# Altium PCB Copy of TQ210_BOARD_V4-20121031.PcbDoc (part 7 of 8)
Units mm, origin at the board's own origin, x right, y up, seen from the top; angles counter-clockwise.
Board outline 191.2 x 131.27 mm, 2 copper layers (TopLayer, BottomLayer); 362 components, 455 nets, 1594 pads, 630 vias.
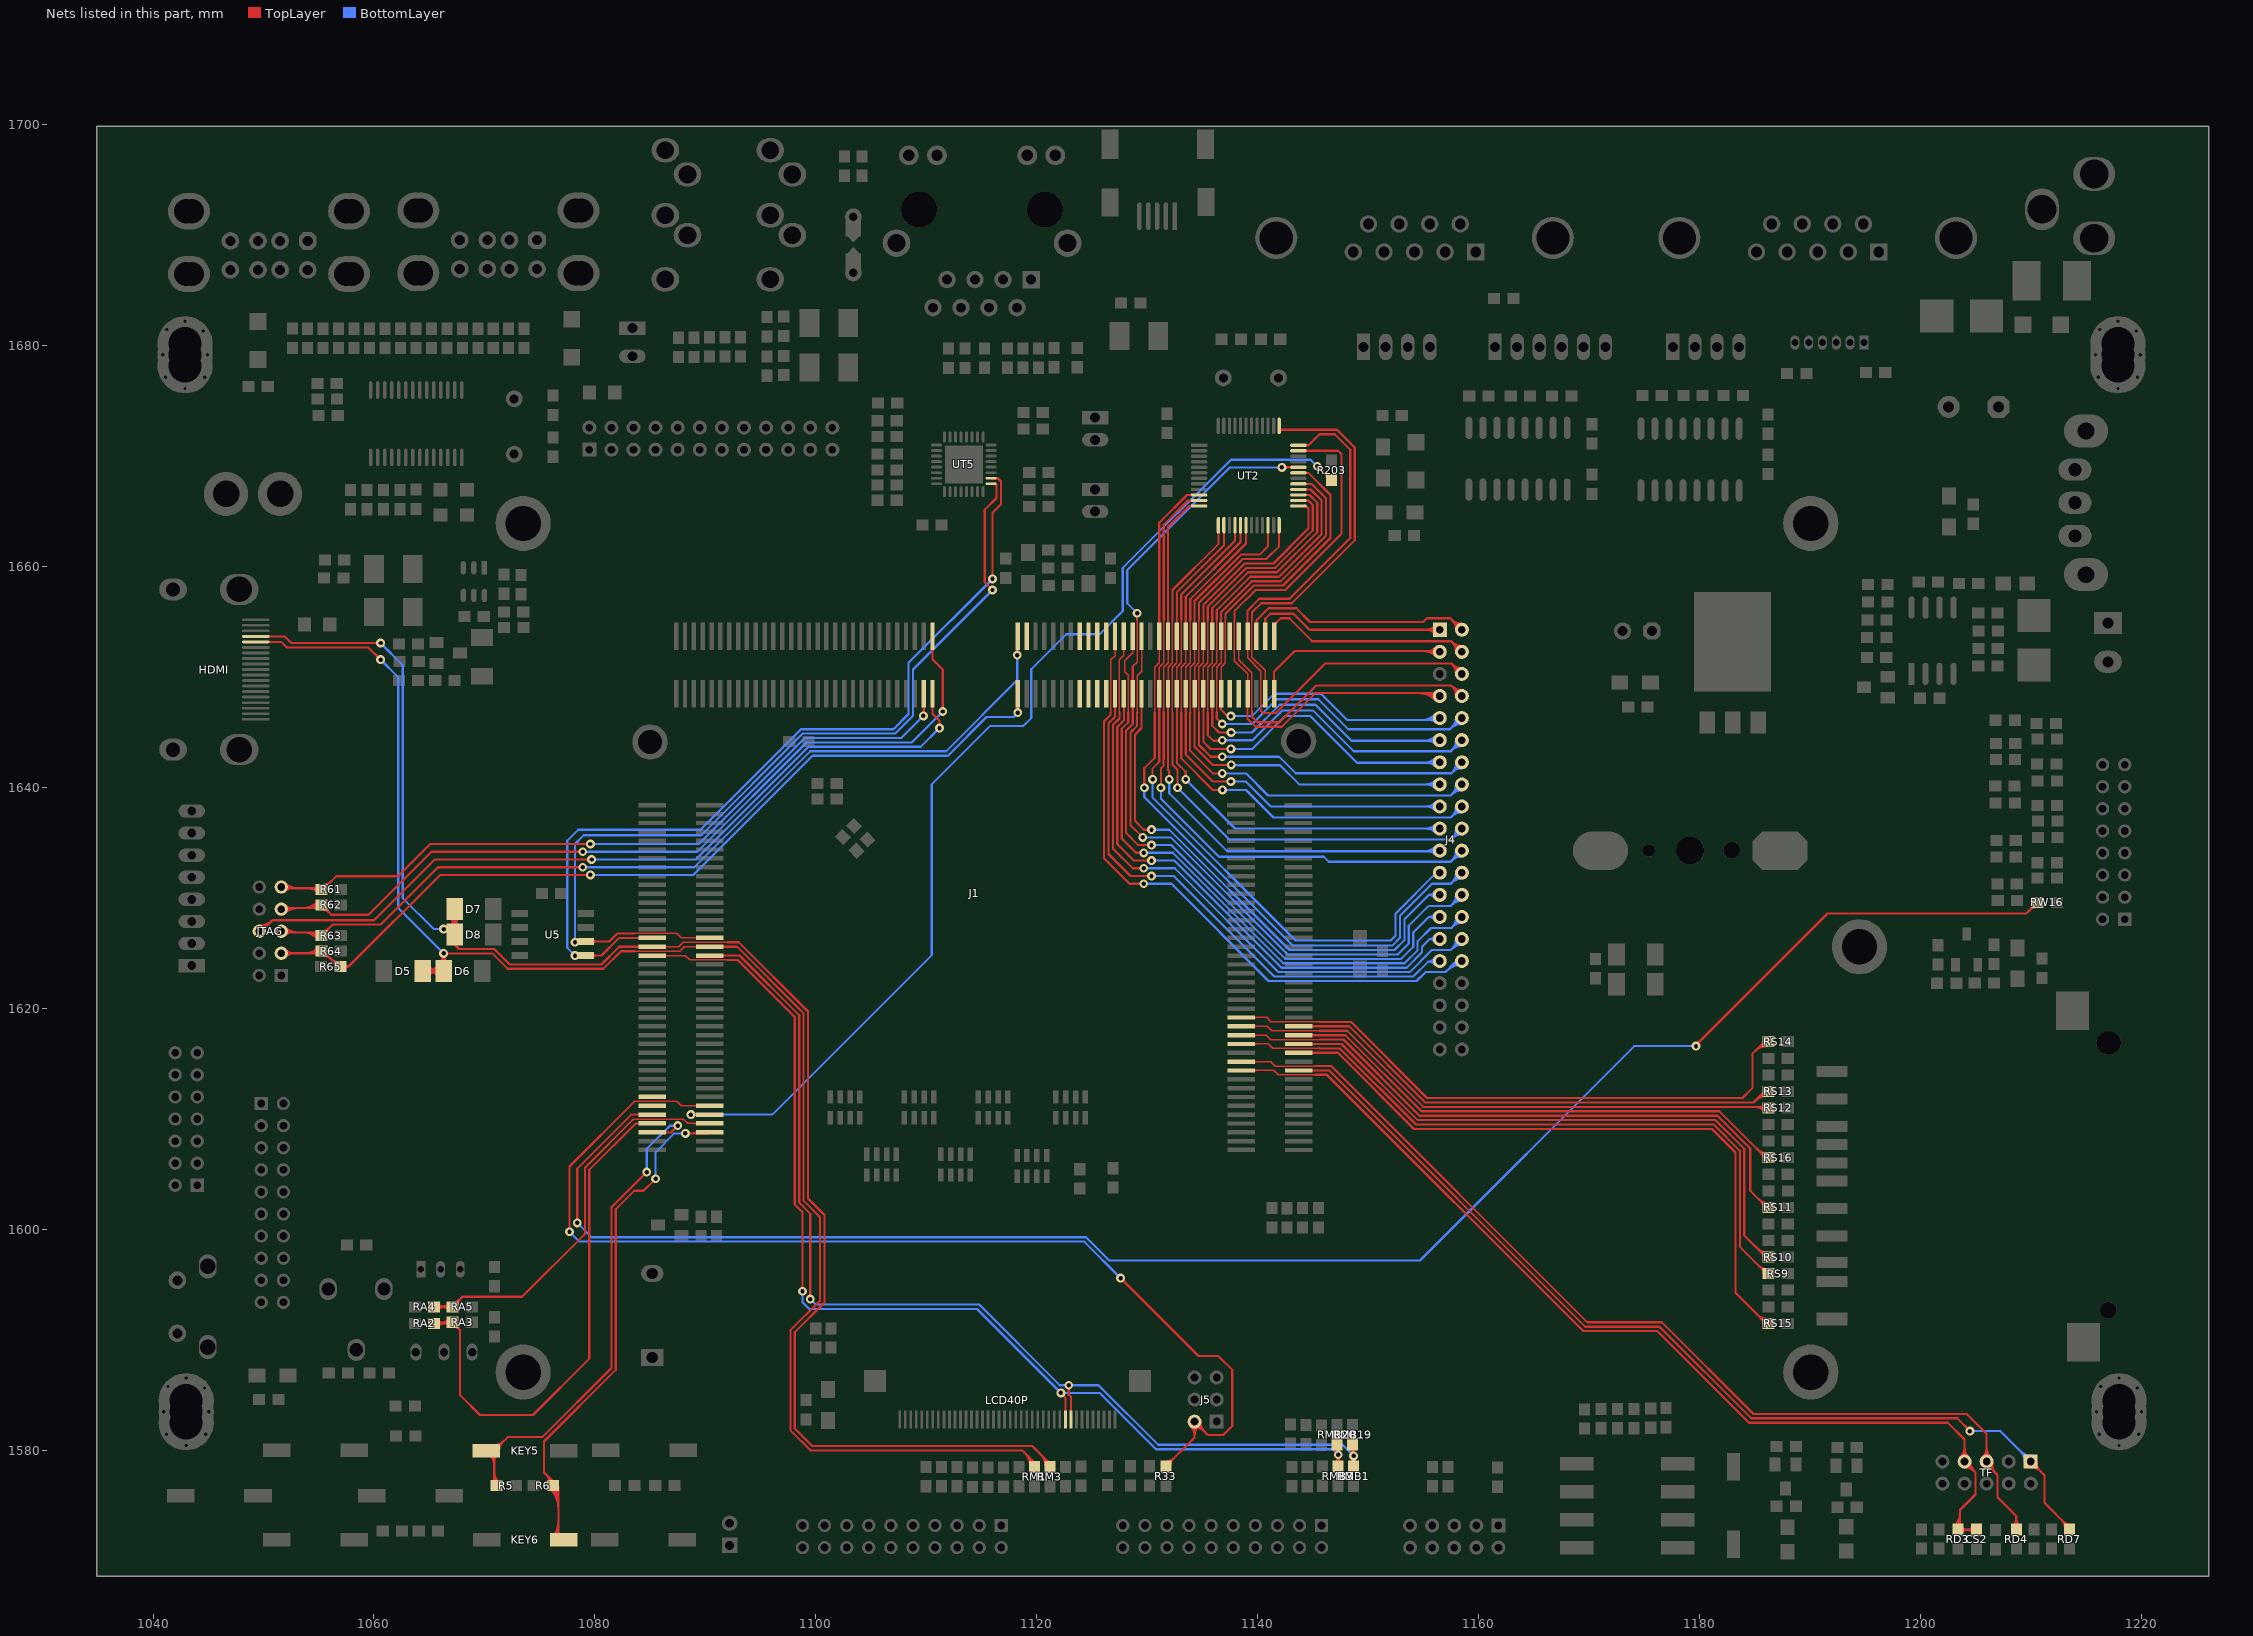
[diagram p7: the nets of this part, all layers, seen from the top]

## Via types
v1: diameter 1, hole 0.5, TopLayer to BottomLayer, 458 vias
v2: diameter 0.8, hole 0.4, TopLayer to BottomLayer, 172 vias

## Nets (pads, with @x,y where several pads share a name; then routed paths per layer and width w, separated by ;. In a path a pad name is that pad's centre, name@x,y a point inside that pad or via, vN(x,y) a via of type N, cw(c..) or ccw(c..) an arc to the next point about the centre after c; other vN are vias at no path point) (continued)
XEINT4: J1.5 KEY5.1 R5.1 | length 52.6
  TopLayer w0.2: KEY5.1@1070.472,1579.622 cw(c1069.44,1578.59) 1070.9,1578.59 ; KEY5.1@1070.614,1579.764 cw(c1069.923,1579.073) 1070.9,1579.073 ; R5.1@1070.767,1577.083 ccw(c1070.446,1577.404) 1070.9,1577.404 ; KEY5.1@1070.826,1580.276 ccw(c1070.826,1581.121) KEY5.1@1071.423,1580.523 ; KEY5.1@1070.826,1580.476 ccw(c1070.826,1581.804) 1071.765,1580.865 ; R5.1@1070.9,1576.8 1070.9,1580 1072.1,1581.2 1075.234,1581.2 1081.5,1587.466 1081.5,1602 v2(1084.7,1605.2) ; 1070.9,1577.645 ccw(c1071.895,1577.645) R5.1@1071.191,1576.941 ; 1070.9,1578.128 ccw(c1072.378,1578.128) R5.1@1071.333,1577.083 ; 1070.9,1578.948 cw(c1071.854,1578.948) KEY5.1@1071.18,1579.622 ; KEY5.1@1071.126,1579.976 cw(c1071.73,1579.976) KEY5.1@1071.303,1580.403 ; KEY5.1@1071.326,1579.976 cw(c1072.412,1579.976) 1071.644,1580.744 ; J1.5@1085.21,1608.79 1086.89,1608.79 v2(1087.5,1609.4) ; J1.5@1086.321,1608.729 cw(c1086.466,1608.584) 1086.466,1608.79 ; J1.5@1086.321,1608.871 ccw(c1086.517,1609.067) 1086.517,1608.79
  BottomLayer w0.2: v2(1084.7,1605.2) 1084.7,1607.3 1086.8,1609.4 v2(1087.5,1609.4)
XEINT5: J1.6 KEY6.1 R6.1 | length 57.5
  TopLayer w0.2: 1075.509,1577.891 cw(c1074.445,1576.826) R6.1@1075.95,1576.803 ; 1075.843,1577.557 cw(c1075.103,1576.816) R6.1@1076.15,1576.8 ; R6.1@1075.967,1576.517 cw(c1074.198,1574.748) 1076.7,1574.748 ; R6.1@1076.109,1576.659 cw(c1074.681,1575.231) 1076.7,1575.231 ; KEY6.1@1076.196,1572.254 ccw(c1074.981,1573.469) 1076.7,1573.469 ; R6.1@1076.25,1576.8 cw(c1075.164,1575.714) 1076.7,1575.714 ; KEY6.1@1076.338,1572.112 ccw(c1075.464,1572.986) 1076.7,1572.986 ; R6.1@1076.391,1576.941 cw(c1075.646,1576.196) 1076.7,1576.196 ; KEY6.1@1076.479,1571.971 ccw(c1075.946,1572.504) 1076.7,1572.504 ; KEY6.1@1076.7,1571.9 1076.7,1576.7 1075.4,1578 1075.4,1580.8 1081.9,1587.3 1081.9,1601.834 1083.566,1603.5 1084.4,1603.5 v2(1085.5,1604.6) ; 1076.7,1572.745 ccw(c1077.395,1572.745) KEY6.1@1076.904,1572.254 ; v2(1088.2,1608.7) 1090.321,1608.7 J1.6@1090.41,1608.79 ; 1088.867,1608.7 ccw(c1088.867,1609.283) J1.6@1089.279,1608.871
  BottomLayer w0.2: v2(1085.5,1604.6) 1085.5,1607 1087.2,1608.7 v2(1088.2,1608.7)
XEINT6: J1.7 RA2.2 RA3.1 | length 52.6
  TopLayer w0.2: RA2.2@1065.45,1591.5 1067.2,1591.5 1067.8,1590.9 1067.8,1585 1069.6,1583.2 1074.406,1583.2 1079.5,1588.294 1079.5,1591.2 1079.5,1605.4 1083.69,1609.59 J1.7@1085.21,1609.59 ; RA2.2@1065.783,1591.217 cw(c1066.466,1590.534) 1066.466,1591.5 cw(c1066.466,1592.466) RA2.2@1065.783,1591.783 ; RA2.2@1065.843,1591.5 ccw(c1065.843,1592.807) RA3.1@1066.767,1591.883 ; RA3.1@1066.767,1591.317 ccw(c1066.326,1590.876) 1066.326,1591.5 ccw(c1066.326,1592.324) RA3.1@1066.909,1591.741 ; RA3.1@1067.15,1591.2 cw(c1067.15,1590.355) 1067.747,1590.953 ; RA3.1@1067.548,1591.56 ccw(c1068.332,1591.482) 1067.775,1590.925
XEINT7: J1.257 RS15.2 | length 62.3
  TopLayer w0.2: J1.257@1143.715,1615.995 1147.276,1615.995 1154.171,1609.1 1181.137,1609.1 1183.269,1606.969 1183.269,1594.259 1186.028,1591.5 RS15.2@1186.25,1591.5 ; 1185.223,1592.305 ccw(c1186.2,1593.282) RS15.2@1186.2,1591.9 ; 1185.564,1591.963 ccw(c1186.2,1592.599) RS15.2@1186.2,1591.7 ; 1185.639,1591.889 cw(c1185.25,1591.5) RS15.2@1185.8,1591.5
XEINT8: J1.8 RA4.2 RA5.1 | length 41
  TopLayer w0.135: 1083.5,1610 1088,1610 1088.4,1609.6 J1.8@1090.4,1609.6 ; J1.8@1089.256,1609.506 ccw(c1089.03,1609.28) 1089.03,1609.6 ccw(c1089.03,1609.92) J1.8@1089.256,1609.694
  TopLayer w0.2: RA4.2@1065.45,1593 RA5.1@1067.1,1593 1068,1593.9 1073.4,1593.9 1079.032,1599.532 ; RA4.2@1065.783,1592.717 cw(c1066.466,1592.034) 1066.466,1593 cw(c1066.466,1593.966) RA4.2@1065.783,1593.283 ; RA5.1@1066.767,1592.717 ccw(c1066.084,1592.034) 1066.084,1593 ccw(c1066.084,1593.966) RA5.1@1066.767,1593.283 ; RA5.1@1067.15,1593.4 ccw(c1067.15,1594.245) 1067.747,1593.647 ; RA5.1@1067.35,1593 cw(c1067.954,1593) RA5.1@1067.527,1593.427 ; RA5.1@1067.55,1593 cw(c1068.636,1593) 1067.868,1593.768 ; 1079.1,1599.6 1079.1,1605.6 1083.426,1609.926
XEINT9: J1.9 RW16.1 | length 162.8
  TopLayer w0.2: v2(1078.4,1600.6) 1078.4,1605.5 1083.3,1610.4 J1.9@1085.2,1610.4 J1.9@1085.21,1610.39 ; v2(1179.7,1616.6) 1179.7,1616.7 1191.6,1628.6 1209.6,1628.6 1210.605,1629.605 RW16.1@1210.621,1629.605 ; 1209.865,1628.865 ccw(c1209.125,1629.605) RW16.1@1210.171,1629.605 ; 1209.946,1628.946 cw(c1210.571,1628.32) RW16.1@1210.571,1629.205 ; RW16.1@1210.206,1629.206 ccw(c1209.808,1629.605) RW16.1@1210.371,1629.605
  BottomLayer w0.2: v2(1078.4,1600.6) 1079.7,1599.3 1124.466,1599.3 1126.566,1597.2 1154.7,1597.2 1174.1,1616.6 v2(1179.7,1616.6)
XEINT10: J1.10 R203.2 | length 101.6
  TopLayer w0.2: v2(1088.7,1610.4) J1.10@1090.4,1610.4 J1.10@1090.41,1610.39 ; J1.10@1089.279,1610.329 ccw(c1089.109,1610.159) 1089.109,1610.4 ccw(c1089.109,1610.641) J1.10@1089.279,1610.471 ; v2(1145.4,1669.1) 1145.45,1669.1 R203.2@1146.7,1667.85 R203.2@1146.5,1667.85 ; 1145.932,1668.618 ccw(c1146.7,1669.386) R203.2@1146.7,1668.3 ; 1146.053,1668.497 cw(c1145.455,1667.9) R203.2@1146.3,1667.9 ; R203.2@1146.273,1668.277 ccw(c1146.7,1668.704) R203.2@1146.7,1668.1
  BottomLayer w0.2: v2(1088.7,1610.4) 1096.059,1610.4 1110.5,1624.84 1110.5,1640.299 1115.798,1645.597 1118.805,1645.597 1119.505,1646.297 1119.505,1650.734 1122.671,1653.9 1125.7,1653.9 1127.8,1656 1127.8,1659.9 1137.6,1669.7 1144.8,1669.7 v2(1145.4,1669.1)
XEINT11: J1.11
XEINT14: J1.12 J5.2 R33.2 | length 113.2
  TopLayer w0.135: 1083.6,1611.6 1087.4,1611.6 1087.8,1611.2 J1.12@1090.4,1611.2 ; J1.12@1089.256,1611.106 ccw(c1089.03,1610.88) 1089.03,1611.2 ccw(c1089.03,1611.52) J1.12@1089.256,1611.294
  TopLayer w0.2: v2(1077.7,1599.8) 1077.7,1605.7 1083.6,1611.6 ; v2(1127.6,1595.6) 1134.652,1588.548 1136.452,1588.548 1137.7,1587.3 1137.7,1582.2 1136.9,1581.4 1135.5,1581.4 J5.2@1134.3,1582.6 1134.3,1581.15 R33.2@1131.7,1578.55 ; R33.2@1131.7,1578.8 ccw(c1131.7,1579.404) R33.2@1132.127,1578.977 ; R33.2@1131.7,1579 ccw(c1131.7,1580.086) 1132.468,1579.318 ; R33.2@1132.1,1578.6 cw(c1132.945,1578.6) 1132.347,1579.197 ; J5.2@1133.922,1582.222 cw(c1133.008,1581.308) 1134.3,1581.308 cw(c1135.592,1581.308) J5.2@1134.678,1582.222 ; J5.2@1134.063,1582.363 cw(c1133.491,1581.791) 1134.3,1581.791 cw(c1135.109,1581.791) J5.2@1134.537,1582.363 ; 1134.872,1582.028 cw(c1135.444,1582.6) 1134.635,1582.6 ccw(c1135.444,1582.6) 1134.872,1582.028 ; 1134.872,1582.028 ccw(c1134.3,1581.456) 1134.3,1582.265 cw(c1134.3,1581.456) 1134.872,1582.028 ; 1135.213,1581.687 cw(c1136.127,1582.6) 1134.835,1582.6 ccw(c1136.127,1582.6) 1135.213,1581.687 ; 1135.213,1581.687 ccw(c1134.3,1580.773) 1134.3,1582.065 cw(c1134.3,1580.773) 1135.213,1581.687
  BottomLayer w0.2: v2(1077.7,1599.8) 1078.6,1598.9 1124.3,1598.9 v2(1127.6,1595.6)
XEINT15: J1.13
XI2CSCL0: J1.50 U5.6 UT5.17 | length 82.7
  TopLayer w0.135: 1083.6,1626.8 1087.4,1626.8 1087.8,1626.4 J1.50@1090.4,1626.4
  TopLayer w0.2: U5.6@1079.194,1626.072 1081.306,1626.072 1082.034,1626.8 1083.6,1626.8 ; U5.6@1079.78,1625.918 cw(c1080.151,1625.547) 1080.151,1626.072 cw(c1080.151,1626.597) U5.6@1079.78,1626.226 ; UT5.17@1115.878,1667.524 1116.176,1667.524 1116.368,1667.332 1116.368,1666.234 1115.3,1665.166 1115.3,1658.6 v2(1116,1657.9) ; UT5.17@1116.235,1667.506 cw(c1115.914,1667.185) 1116.368,1667.185 ; UT5.17@1116.242,1667.502 cw(c1116.144,1667.3) 1116.368,1667.3 ; UT5.17@1116.278,1667.521 ccw(c1116.459,1667.499) 1116.33,1667.37
  BottomLayer w0.2: v2(1078.2,1626) 1078.2,1634.9 1079,1635.7 1089.634,1635.7 1098.834,1644.9 1107.2,1644.9 1108.8,1646.5 1108.8,1650.7 v2(1116,1657.9)
XI2CSCL1: D5.1 D6.2 HDMI.15 J1.48 RM1.2 | length 158.7
  TopLayer w0.12: 1083.6,1625.2 1087.2,1625.2 1087.7,1625.2 1088.09,1625.59 J1.48@1090.41,1625.59
  TopLayer w0.2: HDMI.15@1049.3,1653.2 1051.6,1653.2 1052.1,1652.7 1059.495,1652.7 v2(1060.598,1651.597) ; D5.1@1064.4,1623.4 D6.2@1066.3,1623.4 v2(1066.3,1625) ; D5.1@1064.718,1623.082 cw(c1065.486,1622.314) 1065.486,1623.4 cw(c1065.486,1624.486) D5.1@1064.718,1623.718 ; D5.1@1064.86,1622.94 cw(c1065.969,1621.831) 1065.969,1623.4 cw(c1065.969,1624.969) D5.1@1064.86,1623.86 ; D6.2@1065.84,1622.94 ccw(c1064.731,1621.831) 1064.731,1623.4 ccw(c1064.731,1624.969) D6.2@1065.84,1623.86 ; D6.2@1065.895,1624.158 ccw(c1065.223,1625) v2(1066.3,1625) ; D6.2@1065.982,1623.082 ccw(c1065.214,1622.314) 1065.214,1623.4 ccw(c1065.214,1624.486) D6.2@1065.982,1623.718 ; D6.2@1066.019,1624.002 ccw(c1065.555,1624.585) 1066.3,1624.585 ccw(c1067.045,1624.585) D6.2@1066.581,1624.002 ; D6.2@1066.705,1624.158 cw(c1067.377,1625) v2(1066.3,1625) ; 1083.6,1625.2 1082.367,1625.2 1080.767,1623.6 1072.1,1623.6 1070.7,1625 v2(1066.3,1625) ; J1.48@1090.41,1625.59 1092.879,1625.59 1098.4,1620.068 1098.9,1619.569 1098.9,1602.6 1100.39,1601.11 1100.39,1593.556 1097.7,1590.866 1097.7,1581.82 1099.52,1580 1118.7,1580 RM1.2@1120,1578.7 ; 1118.868,1579.832 cw(c1117.585,1578.548) RM1.2@1119.4,1578.548 ; 1119.21,1579.49 cw(c1118.268,1578.548) RM1.2@1119.6,1578.548 ; 1119.551,1579.149 cw(c1118.951,1578.548) RM1.2@1119.8,1578.548
  BottomLayer w0.2: v2(1060.598,1651.597) 1062.2,1649.995 1062.2,1629.1 v2(1066.3,1625)
XI2CSCL2: J1.46 LCD40P.32 RMB1.2 RMB19.2 | length 100.1
  TopLayer w0.2: J1.46@1090.41,1624.79 1090.421,1624.8 1093.103,1624.8 1098.5,1619.403 1098.5,1602.434 1099.5,1601.434 v2(1099.5,1593.7) ; v2(1122.9,1585.9) 1122.9,1585.066 1123.1,1584.866 LCD40P.32@1123.1,1582.8 ; RMB19.2@1148.317,1580.217 cw(c1147.393,1579.293) v2@1148.7,1579.293 ; RMB1.2@1148.417,1578.883 ccw(c1147.734,1579.566) 1148.7,1579.566 ccw(c1149.666,1579.566) RMB1.2@1148.983,1578.883 ; RMB19.2@1148.459,1580.359 cw(c1147.876,1579.776) 1148.7,1579.776 cw(c1149.324,1579.776) RMB19.2@1148.883,1580.217 ; RMB1.2@1148.7,1578.55 RMB19.2@1148.7,1580.25
  BottomLayer w0.2: v2(1099.5,1593.7) 1100,1593.2 1114.8,1593.2 1122.1,1585.9 1125.6,1585.9 1131,1580.5 1147.7,1580.5 v2(1148.7,1579.5)
XI2CSDA0: J1.49 U5.5 UT5.18 | length 80.2
  TopLayer w0.2: U5.5@1079.194,1624.802 1080.602,1624.802 1082.2,1626.4 J1.49@1085.2,1626.4 ; U5.5@1079.78,1624.648 cw(c1080.151,1624.277) 1080.151,1624.802 cw(c1080.151,1625.327) U5.5@1079.78,1624.956 ; UT5.18@1115.878,1668.024 1116.471,1668.024 1116.768,1667.726 1116.768,1665.668 1116,1664.9 v2(1116,1658.9) ; UT5.18@1116.253,1667.999 cw(c1116.253,1667.413) 1116.667,1667.827 ; UT5.18@1116.259,1668 cw(c1116.347,1667.682) 1116.579,1667.915
  BottomLayer w0.2: v2(1078.2,1624.8) 1077.5,1625.5 1077.5,1635.2 1078.5,1636.2 1089.569,1636.2 1098.669,1645.3 1107.034,1645.3 1108.4,1646.666 1108.4,1651.3 v2(1116,1658.9)
XI2CSDA1: D7.1 D8.2 HDMI.16 J1.47 RM3.2 | length 154.9
  TopLayer w0.135: J1.47@1085.2,1625.6 1087.6,1625.6 1088,1626 1092,1626
  TopLayer w0.2: HDMI.16@1049.3,1653.7 1051.9,1653.7 1052.503,1653.097 v2(1060.598,1653.097) ; D8.2@1066.84,1627.41 ccw(c1065.731,1628.519) 1067.3,1628.519 ccw(c1068.869,1628.519) D8.2@1067.76,1627.41 ; D7.1@1066.84,1628.29 cw(c1065.731,1627.181) 1067.3,1627.181 cw(c1068.869,1627.181) D7.1@1067.76,1628.29 ; D8.2@1066.982,1627.268 ccw(c1066.214,1628.036) 1067.3,1628.036 ccw(c1068.386,1628.036) D8.2@1067.618,1627.268 ; D7.1@1066.982,1628.432 cw(c1066.214,1627.664) 1067.3,1627.664 cw(c1068.386,1627.664) D7.1@1067.618,1628.432 ; D7.1@1067.3,1629.4 1067.3,1625.8 1067.7,1625.4 1070.9,1625.4 1072.3,1624 1080.601,1624 1082.201,1625.6 J1.47@1085.2,1625.6 J1.47@1085.21,1625.59 ; 1092,1626 1093.034,1626 1099.3,1619.734 1099.3,1602.8 1100.79,1601.31 1100.79,1593.39 1098.1,1590.7 1098.1,1581.985 1099.685,1580.4 1119.6,1580.4 RM3.2@1121.3,1578.7 ; 1120.339,1579.661 cw(c1119.226,1578.548) RM3.2@1120.8,1578.548 ; 1120.681,1579.319 cw(c1119.909,1578.548) RM3.2@1121,1578.548 ; 1120.947,1579.053 ccw(c1121.2,1579.306) RM3.2@1121.2,1578.948
  BottomLayer w0.2: v2(1060.598,1653.097) 1062.6,1651.095 1062.6,1630 1065.4,1627.2 v2(1066.3,1627.2)
XI2CSDA2: J1.45 LCD40P.31 RMB3.2 RMB20.2 | length 103.5
  TopLayer w0.135: J1.45@1085.2,1624.8 1088.2,1624.8 1088.6,1624.4 1092,1624.4
  TopLayer w0.2: 1092,1624.4 1092.937,1624.4 1098.1,1619.237 1098.1,1602.269 1098.8,1601.569 v2(1098.8,1594.4) ; v2(1122.2,1585.2) 1122.6,1584.8 LCD40P.31@1122.6,1582.8 ; RMB20.2@1146.917,1580.217 cw(c1145.993,1579.293) v2@1147.3,1579.293 ; RMB3.2@1147.017,1578.883 ccw(c1146.334,1579.566) 1147.3,1579.566 ccw(c1148.266,1579.566) RMB3.2@1147.583,1578.883 ; RMB20.2@1147.059,1580.359 cw(c1146.476,1579.776) 1147.3,1579.776 cw(c1147.924,1579.776) RMB20.2@1147.483,1580.217 ; RMB3.2@1147.3,1578.55 RMB20.2@1147.3,1580.25
  BottomLayer w0.2: v2(1098.8,1594.4) 1098.8,1593.4 1099.4,1592.8 1114.6,1592.8 v2(1122.2,1585.2) 1125.7,1585.2 1130.8,1580.1 1146.8,1580.1 v2(1147.3,1579.6)
XJDBGSEL: J1.143
XJTCK: J1.138 JTAG.9 R61.2 | length 73.9
  TopLayer w0.2: JTAG.9@1051.712,1630.904 1055.504,1630.904 1056.585,1631.985 1062.185,1631.985 1065.1,1634.9 v2(1079.6,1634.9) ; JTAG.9@1051.824,1631.216 ccw(c1052.578,1631.969) 1052.578,1630.904 ccw(c1052.578,1630.038) JTAG.9@1051.966,1630.65 ; JTAG.9@1051.966,1631.357 ccw(c1053.061,1632.452) 1053.061,1630.904 ; 1053.968,1630.904 cw(c1053.968,1629.577) R61.2@1054.906,1630.515 ; 1054.451,1630.904 cw(c1054.451,1630.06) R61.2@1055.048,1630.656 ; 1054.479,1630.904 ccw(c1054.479,1631.508) R61.2@1054.906,1631.081 ; R61.2@1055.289,1630.998 ccw(c1055.289,1631.743) 1055.816,1631.216 ; R61.2@1055.289,1631.198 ccw(c1055.289,1632.426) 1056.158,1631.558 ; R61.2@1055.689,1630.798 cw(c1056.392,1630.798) 1055.895,1631.295 ; J1.138@1109.7,1647.385 cw(c1109.529,1647.214) 1109.771,1647.214 cw(c1110.012,1647.214) J1.138@1109.841,1647.385 ; v2@1109.771,1646.521 J1.138@1109.771,1648.506
  BottomLayer w0.2: v2(1079.6,1634.9) 1089.4,1634.9 1099,1644.5 1107.75,1644.5 v2(1109.75,1646.5)
XJTDI: J1.141 JTAG.5 R63.2 | length 88.8
  TopLayer w0.2: JTAG.5@1051.712,1626.904 1051.716,1626.9 R63.2@1055.3,1626.9 ; JTAG.5@1051.824,1627.216 ccw(c1052.586,1627.978) 1052.586,1626.9 ; JTAG.5@1051.966,1626.65 cw(c1052.569,1626.047) 1052.569,1626.9 ; JTAG.5@1051.966,1627.357 ccw(c1053.069,1628.461) 1053.069,1626.9 ; 1053.494,1626.9 cw(c1053.494,1624.903) R63.2@1054.906,1626.315 ; 1053.977,1626.9 cw(c1053.977,1625.386) R63.2@1055.048,1626.456 ; 1054.46,1626.9 cw(c1054.46,1625.869) R63.2@1055.189,1626.598 ; R63.2@1055.239,1626.598 1056.241,1627.6 1060.6,1627.6 1065.8,1632.8 v2(1078.9,1632.8) ; R63.2@1055.289,1626.998 ccw(c1055.289,1627.843) 1055.887,1627.245 ; R63.2@1055.489,1626.598 cw(c1056.093,1626.598) R63.2@1055.666,1627.025 ; R63.2@1055.689,1626.598 cw(c1056.776,1626.598) 1056.007,1627.366 ; v2(1118.25,1652) J1.141@1118.25,1653.5 ; v2@1118.25,1652.304 cw(c1118.647,1652.304) J1.141@1118.366,1652.585 ; J1.141@1118.296,1653.5 J1.141@1118.296,1653.706
  BottomLayer w0.2: v2(1078.9,1632.8) 1089.001,1632.8 1099.501,1643.3 1111.804,1643.3 1118.25,1649.746 v2(1118.25,1652)
XJTDO: J1.140 JTAG.6 | length 75.7
  TopLayer w0.2: JTAG.6@1049.612,1627.304 ccw(c1049.612,1628.511) 1050.466,1627.657 ; JTAG.6@1049.612,1627.504 ccw(c1049.612,1629.194) 1050.807,1627.999 ; JTAG.6@1049.712,1626.904 1050.808,1628 1060,1628 1065.5,1633.5 v2(1079.7,1633.5) ; JTAG.6@1050.112,1627.004 cw(c1050.836,1627.004) 1050.324,1627.516 ; J1.140@1110.5,1647.385 cw(c1110.329,1647.214) 1110.571,1647.214 cw(c1110.812,1647.214) J1.140@1110.641,1647.385 ; J1.140@1110.571,1648.506 1110.571,1646.7 1111.2,1646.071 v2(1111.2,1645.4)
  BottomLayer w0.2: v2(1079.7,1633.5) 1089.135,1633.5 1099.335,1643.7 1109.5,1643.7 v2(1111.2,1645.4)
XJTMS: J1.139 JTAG.7 R62.2 | length 83.8
  TopLayer w0.2: JTAG.7@1051.6,1629.1 1054.941,1629.1 R62.2@1055.239,1629.398 1056.137,1628.5 1059.5,1628.5 1065.2,1634.2 v2(1078.9,1634.2) ; JTAG.7@1051.824,1628.791 cw(c1052.569,1628.047) 1052.569,1629.1 ; JTAG.7@1051.966,1628.65 cw(c1053.052,1627.564) 1053.052,1629.1 ; JTAG.7@1051.966,1629.357 ccw(c1052.586,1629.978) 1052.586,1629.1 ; 1053.504,1629.1 ccw(c1053.504,1631.083) R62.2@1054.906,1629.681 ; 1053.987,1629.1 ccw(c1053.987,1630.6) R62.2@1055.048,1629.539 ; 1054.47,1629.1 ccw(c1054.47,1630.117) R62.2@1055.189,1629.398 ; R62.2@1055.289,1628.998 cw(c1055.289,1628.153) 1055.887,1628.75 ; R62.2@1055.489,1629.398 ccw(c1056.093,1629.398) R62.2@1055.666,1628.971 ; R62.2@1055.689,1629.398 ccw(c1056.776,1629.398) 1056.007,1628.63 ; J1.139@1110.5,1652.585 cw(c1110.329,1652.414) 1110.571,1652.414 cw(c1110.812,1652.414) J1.139@1110.641,1652.585 ; J1.139@1110.571,1653.706 1110.571,1651.629 1111.5,1650.699 v2(1111.5,1646.9)
  BottomLayer w0.2: v2(1078.9,1634.2) 1089.27,1634.2 1099.17,1644.1 1108.7,1644.1 v2(1111.5,1646.9)
XJTRSTN: J1.142 JTAG.3 R64.2 R65.2 | length 89.4
  TopLayer w0.2: JTAG.3@1051.612,1625.004 1055.596,1625.004 R65.2@1056.6,1624 ; JTAG.3@1051.824,1624.791 cw(c1052.336,1624.279) 1052.336,1625.004 cw(c1052.336,1625.728) JTAG.3@1051.824,1625.216 ; JTAG.3@1051.966,1624.65 cw(c1052.819,1623.796) 1052.819,1625.004 cw(c1052.819,1626.211) JTAG.3@1051.966,1625.357 ; 1053.754,1625.004 ccw(c1053.754,1626.633) R64.2@1054.906,1625.481 ; 1054.237,1625.004 ccw(c1054.237,1626.15) R64.2@1055.048,1625.339 ; R64.2@1054.692,1625.004 cw(c1054.692,1624.701) R64.2@1054.906,1624.915 ; R64.2@1054.72,1625.004 ccw(c1054.72,1625.667) R64.2@1055.189,1625.198 ; R64.2@1055.289,1624.798 cw(c1055.289,1623.559) 1056.165,1624.435 ; R64.2@1055.289,1624.998 cw(c1055.289,1624.242) 1055.823,1624.777 ; R64.2@1055.689,1625.198 ccw(c1056.382,1625.198) 1055.892,1624.708 ; 1056.035,1624.565 ccw(c1056.911,1625.441) R65.2@1056.911,1624.202 ; 1056.308,1624.292 cw(c1055.818,1623.802) R65.2@1056.511,1623.802 ; 1056.377,1624.223 ccw(c1056.911,1624.758) R65.2@1056.911,1624.002 ; R65.2@1056.961,1623.802 1057.702,1623.802 ; R65.2@1057.358,1623.603 cw(c1057.702,1623.405) 1057.702,1623.802 ; R65.2@1057.358,1624.001 ccw(c1057.702,1624.199) 1057.702,1623.802 ; v2(1079.6,1632.1) 1066,1632.1 1057.702,1623.802 ; J1.142@1118.225,1647.385 cw(c1118.054,1647.214) 1118.296,1647.214 cw(c1118.537,1647.214) J1.142@1118.366,1647.385 ; v2(1118.296,1646.796) J1.142@1118.296,1648.506
  BottomLayer w0.2: v2(1079.6,1632.1) 1088.901,1632.1 1099.701,1642.9 1111.97,1642.9 1115.466,1646.397 1117.897,1646.397 v2(1118.296,1646.796)
XM0ADDR0: J1.170 J4.25 | length 48.6
  TopLayer w0.2: J1.170@1129.496,1648.506 1129.496,1645.396 1128.9,1644.8 1128.9,1637 1129.7,1636.2 v2(1130.4,1636.2)
  BottomLayer w0.2: v2(1130.4,1636.2) 1132,1636.2 1142.9,1625.3 1152.4,1625.3 1153.294,1626.194 1153.294,1628.07 1155.523,1630.3 ; J4.25@1156.049,1630.012 ccw(c1155.523,1629.676) 1155.523,1630.3 ; J4.25@1156.049,1630.588 cw(c1155.523,1630.924) 1155.523,1630.3 ; J4.25@1156.5,1630.3 1155.523,1630.3
XM0ADDR1: J1.169 J4.26 | length 58.8
  TopLayer w0.135: 1129.094,1646.797 1129.094,1650.14 1129.496,1650.541 J1.169@1129.496,1653.706
  TopLayer w0.2: 1129.1,1646.8 1129.096,1646.796 1129.096,1645.6 1128.5,1645.004 1128.5,1636.6 v2(1129.6,1635.5)
  BottomLayer w0.2: v2(1129.6,1635.5) 1132.134,1635.5 1142.734,1624.9 1152.7,1624.9 1153.694,1625.894 1153.694,1627.494 1155.5,1629.3 1157.5,1629.3 J4.26@1158.5,1630.3 ; J4.26@1157.965,1630.3 cw(c1156.673,1630.3) 1157.587,1629.387 cw(c1158.5,1628.473) J4.26@1158.5,1629.765 ; J4.26@1158.165,1630.3 cw(c1157.356,1630.3) 1157.928,1629.728 cw(c1158.5,1629.156) J4.26@1158.5,1629.965
XM0ADDR2: J1.168 J4.27 UT2.32 | length 80.6
  TopLayer w0.135: 1128.696,1650.979 1129.095,1651.378 1129.095,1655.205
  TopLayer w0.2: 1128.696,1650.979 1128.696,1645.767 1128.1,1645.172 1128.1,1635.9 1129.2,1634.8 v2(1130.4,1634.8) ; 1129.095,1655.205 v2@1129.095,1655.695 ; v2(1142.2,1669) 1142.204,1669.004 UT2.32@1143.703,1669.004
  BottomLayer w0.2: v2(1129.1,1655.8) 1128.2,1656.7 1128.2,1659.7 1137.5,1669 v2(1142.2,1669) ; v2(1130.4,1634.8) 1132.2,1634.8 1142.5,1624.5 1153,1624.5 1154.094,1625.594 1154.094,1626.894 1155.5,1628.3 ; J4.27@1156.055,1628.003 ccw(c1155.5,1627.633) 1155.5,1628.3 ; J4.27@1156.055,1628.597 cw(c1155.5,1628.967) 1155.5,1628.3 ; J4.27@1156.5,1628.3 1155.5,1628.3
XM0ADDR3: J1.167 J4.28 | length 59.9
  TopLayer w0.135: 1128.296,1646.804 1128.296,1650.185 1127.963,1650.517 1127.963,1651.492 1128.696,1652.224 J1.167@1128.696,1653.706
  TopLayer w0.2: 1128.296,1645.933 1127.7,1645.337 1127.7,1635.4 1129,1634.1 v2(1129.7,1634.1) ; 1128.3,1645.933 1128.3,1646.8
  BottomLayer w0.2: v2(1129.7,1634.1) 1132.334,1634.1 1142.334,1624.1 1153.3,1624.1 1154.494,1625.294 1154.494,1626.094 1155.7,1627.3 1157.55,1627.3 J4.28@1158.5,1628.25 ; 1157.575,1627.325 ccw(c1156.633,1628.267) J4.28@1157.965,1628.291 ; 1157.672,1627.422 cw(c1158.5,1626.594) J4.28@1158.5,1627.765 ; 1157.908,1627.658 ccw(c1157.288,1628.279) J4.28@1158.165,1628.294 ; 1158.013,1627.763 cw(c1158.5,1627.277) J4.28@1158.5,1627.965
XM0ADDR4: J1.166 J4.29 | length 50.1
  TopLayer w0.2: J1.166@1127.906,1648.495 1127.906,1646.109 1127.3,1645.503 1127.3,1634.9 1128.8,1633.4 v2(1130.4,1633.4)
  BottomLayer w0.2: v2(1130.4,1633.4) 1132.469,1633.4 1142.169,1623.7 1153.5,1623.7 1154.894,1625.094 1154.894,1625.595 1155.598,1626.3 ; J4.29@1156.03,1626.044 ccw(c1155.598,1625.808) 1155.598,1626.3 ; J4.29@1156.03,1626.556 cw(c1155.598,1626.792) 1155.598,1626.3 ; J4.29@1156.5,1626.3 1155.598,1626.3
XM0ADDR5: J1.165 J4.30 | length 60.9
  TopLayer w0.135: 1127.497,1646.803 1127.497,1651.592 1127.896,1651.991 J1.165@1127.896,1653.706 ; J1.165@1127.802,1652.562 cw(c1127.576,1652.336) 1127.896,1652.336 cw(c1128.215,1652.336) J1.165@1127.989,1652.562
  TopLayer w0.2: 1127.496,1646.264 1126.9,1645.669 1126.9,1634.5 1128.7,1632.7 v2(1129.7,1632.7) ; 1127.5,1646.264 1127.5,1646.8
  BottomLayer w0.2: v2(1129.7,1632.7) 1132.5,1632.7 1141.9,1623.3 1153.778,1623.3 1155.778,1625.3 1157.5,1625.3 J4.30@1158.5,1626.3 ; J4.30@1157.965,1626.3 cw(c1156.673,1626.3) 1157.587,1625.387 cw(c1158.5,1624.473) J4.30@1158.5,1625.765 ; J4.30@1158.165,1626.3 cw(c1157.356,1626.3) 1157.928,1625.728 cw(c1158.5,1625.156) J4.30@1158.5,1625.965
XM0ADDR6: J1.164 J4.31 | length 51.8
  TopLayer w0.2: J1.164@1127.096,1648.506 1127.096,1646.43 1126.5,1645.834 1126.5,1634 1128.5,1632 v2(1130.4,1632)
  BottomLayer w0.2: v2(1130.4,1632) 1132.4,1632 1141.027,1623.373 1141.5,1622.9 1154.1,1622.9 1155.45,1624.25 ; 1155.809,1624.25 ccw(c1155.809,1624.728) J4.31@1156.215,1624.476 ; J4.31@1156.045,1624.582 cw(c1155.45,1624.95) 1155.45,1624.25 ; J4.31@1156.093,1623.953 ccw(c1155.45,1623.406) 1155.45,1624.25 ; J4.31@1156.5,1624.25 1155.45,1624.25
XM0ADDR7: J1.163 J4.32 | length 62.3
  TopLayer w0.135: 1126.695,1646.796 1126.695,1651.565 1127.096,1651.965 J1.163@1127.096,1653.706 ; J1.163@1127.002,1652.562 cw(c1126.776,1652.336) 1127.096,1652.336 cw(c1127.415,1652.336) J1.163@1127.189,1652.562
  TopLayer w0.2: 1126.696,1646.796 1126.696,1646.596 1126.1,1646 1126.1,1633.6 1128.4,1631.3 v2(1129.7,1631.3)
  BottomLayer w0.2: v2(1129.7,1631.3) 1132.2,1631.3 1141,1622.5 1154.4,1622.5 1155.2,1623.3 1157,1623.3 1158,1624.3 J4.32@1158.5,1624.3 ; 1157.088,1623.388 cw(c1158.482,1621.994) J4.32@1158.497,1623.965 ; 1157.425,1623.725 cw(c1158.487,1622.664) J4.32@1158.499,1624.165 ; 1157.763,1624.063 cw(c1158.492,1623.333) J4.32@1158.501,1624.365
XM0ADDR8: J1.162
XM0ADDR9: J1.161
XM0ADDR10: J1.160
XM0ADDR11: J1.159
XM0ADDR12: J1.158
XM0ADDR13: J1.157
XM0ADDR14: J1.156
XM0ADDR15: J1.155
XM0BE0: J1.189
XM0BE1: J1.190
XM0CSN0: J1.195 J4.2 | length 25
  TopLayer w0.2: J1.195@1139.896,1653.706 J1.195@1139.952,1653.762 ; J1.195@1139.9,1653.71 1139.9,1655.164 1140.986,1656.25 1143.5,1656.25 1144.75,1655 1155,1655 1155.35,1655.35 1157.45,1655.35 J4.2@1158.5,1654.3 ; J4.2@1157.965,1654.3 ccw(c1156.673,1654.3) 1157.587,1655.213 ccw(c1158.5,1656.127) J4.2@1158.5,1654.835 ; J4.2@1158.165,1654.3 ccw(c1157.356,1654.3) 1157.928,1654.872 ccw(c1158.5,1655.444) J4.2@1158.5,1654.635
XM0CSN1: J1.198 UT2.37 | length 35.8
  TopLayer w0.12: J1.198@1140.696,1648.506 J1.198@1140.696,1648.508
  TopLayer w0.135: 1139.497,1655.197 1139.497,1651.817 1140.696,1650.619 J1.198@1140.696,1648.506
  TopLayer w0.2: 1139.5,1655.2 1139.5,1655.877 ; 1139.54,1655.917 1140.323,1656.7 1143.1,1656.7 1148.8,1662.4 1148.8,1670.8 1147.2,1672.4 UT2.37@1141.903,1672.4
XM0CSN3: J1.197 J4.1 | length 21.9
  TopLayer w0.2: J1.197@1140.625,1654.827 ccw(c1140.454,1654.997) 1140.696,1654.997 ccw(c1140.937,1654.997) J1.197@1140.766,1654.827 ; J1.197@1140.696,1653.706 1140.696,1655.293 1141.153,1655.75 1143.25,1655.75 1144.7,1654.3 J4.1@1156.5,1654.3 ; J4.1@1156.122,1653.922 ccw(c1155.208,1653.008) 1155.208,1654.3 ccw(c1155.208,1655.592) J4.1@1156.122,1654.678 ; J4.1@1156.263,1654.063 ccw(c1155.691,1653.491) 1155.691,1654.3 ccw(c1155.691,1655.109) J4.1@1156.263,1654.537
XM0CSN4: J1.200 J4.3 | length 21.5
  TopLayer w0.2: J1.200@1141.425,1649.627 ccw(c1141.254,1649.797) 1141.496,1649.797 ccw(c1141.737,1649.797) J1.200@1141.566,1649.627 ; J1.200@1141.496,1648.506 1141.496,1650.5 1143.367,1652.372 1156.428,1652.372 J4.3@1156.5,1652.3 ; 1155.036,1652.372 cw(c1155.036,1650.836) J4.3@1156.122,1651.922 ; 1155.381,1652.372 ccw(c1155.381,1653.419) J4.3@1156.122,1652.678 ; 1155.518,1652.372 cw(c1155.518,1651.318) J4.3@1156.263,1652.063 ; 1155.864,1652.372 ccw(c1155.864,1652.936) J4.3@1156.263,1652.537
XM0CSN5: J1.199 J4.4 | length 23.1
  TopLayer w0.2: J1.199@1141.496,1653.706 1141.496,1654.728 1142.111,1655.343 1142.873,1655.343 1144.956,1653.261 1157.539,1653.261 J4.4@1158.5,1652.3 ; J1.199@1141.496,1654.856 ccw(c1141.496,1655.164) 1141.714,1654.946 ; J4.4@1157.965,1652.3 ccw(c1156.673,1652.3) 1157.587,1653.213 ccw(c1158.5,1654.127) J4.4@1158.5,1652.835 ; J4.4@1158.165,1652.3 ccw(c1157.356,1652.3) 1157.928,1652.872 ccw(c1158.5,1653.444) J4.4@1158.5,1652.635
XM0DATA0: J1.180 J4.17 UT2.18 | length 51.3
  TopLayer w0.135: J1.180@1133.496,1648.506 1133.496,1650.896 1133.896,1651.296 1133.896,1655.196
  TopLayer w0.2: J1.180@1133.496,1648.506 1133.496,1643.004 1135.939,1640.561 v2(1137.59,1640.561) ; 1133.9,1655.2 1133.9,1657.06 1138.953,1662.113 UT2.18@1138.953,1663.754
  BottomLayer w0.2: v2(1137.59,1640.561) 1138.939,1640.561 1141.2,1638.3 J4.17@1156.5,1638.3 ; J4.17@1156.122,1637.922 ccw(c1155.208,1637.008) 1155.208,1638.3 ccw(c1155.208,1639.592) J4.17@1156.122,1638.678 ; J4.17@1156.263,1638.063 ccw(c1155.691,1637.491) 1155.691,1638.3 ccw(c1155.691,1639.109) J4.17@1156.263,1638.537
XM0DATA1: J1.179 J4.18 UT2.17 | length 54.6
  TopLayer w0.135: 1133.094,1646.797 1133.094,1650.894 1133.496,1651.296 J1.179@1133.496,1653.706
  TopLayer w0.2: 1133.1,1646.8 1133.096,1646.796 1133.096,1642.654 1135.951,1639.799 v2(1136.828,1639.799) ; J1.179@1133.496,1653.706 1133.5,1653.71 1133.5,1657.3 1138.453,1662.253 UT2.17@1138.453,1663.754
  BottomLayer w0.2: v2(1136.828,1639.799) 1138.951,1639.799 1141.45,1637.3 1157.5,1637.3 J4.18@1158.431,1638.231 ; J4.18@1157.965,1638.3 cw(c1156.673,1638.3) 1157.587,1637.387 cw(c1158.5,1636.473) J4.18@1158.5,1637.765 ; J4.18@1158.165,1638.3 cw(c1157.356,1638.3) 1157.928,1637.728 cw(c1158.5,1637.156) J4.18@1158.5,1637.965
XM0DATA2: J1.178 J4.19 UT2.16 | length 53.6
  TopLayer w0.135: J1.178@1132.696,1648.506 1132.696,1650.896 1133.094,1651.294 1133.094,1655.194
  TopLayer w0.2: J1.178@1132.696,1648.506 1132.696,1642.241 1133.5,1641.436 v2(1133.5,1640.75) ; 1133.1,1655.2 1133.1,1657.5 1137.953,1662.353 UT2.16@1137.953,1663.754
  BottomLayer w0.2: v2(1133.5,1640.75) 1137.95,1636.3 J4.19@1156.5,1636.3 ; J4.19@1156.122,1635.922 ccw(c1155.208,1635.008) 1155.208,1636.3 ccw(c1155.208,1637.592) J4.19@1156.122,1636.678 ; J4.19@1156.263,1636.063 ccw(c1155.691,1635.491) 1155.691,1636.3 ccw(c1155.691,1637.109) J4.19@1156.263,1636.537
XM0DATA3: J1.177 J4.20 UT2.14 | length 57.3
  TopLayer w0.135: 1132.296,1646.804 1132.296,1650.896 1132.696,1651.296 J1.177@1132.696,1653.706
  TopLayer w0.2: 1132.3,1646.8 1132.3,1642.071 1132.75,1641.621 v2(1132.75,1640) ; J1.177@1132.696,1653.706 1132.696,1657.696 1136.953,1661.953 UT2.14@1136.953,1663.754
  BottomLayer w0.2: v2(1132.75,1640) 1137.45,1635.3 1157.5,1635.3 1158.4,1636.2 J4.20@1158.5,1636.3 ; J4.20@1157.965,1636.3 cw(c1156.673,1636.3) 1157.587,1635.387 cw(c1158.5,1634.473) J4.20@1158.5,1635.765 ; J4.20@1158.165,1636.3 cw(c1157.356,1636.3) 1157.928,1635.728 cw(c1158.5,1635.156) J4.20@1158.5,1635.965
XM0DATA4: J1.176 J4.21 UT2.13 | length 56.2
  TopLayer w0.135: J1.176@1131.896,1648.506 1131.896,1650.897 1132.296,1651.297 1132.296,1655.196
  TopLayer w0.2: J1.176@1131.896,1648.506 1131.896,1641.604 1132,1641.5 v2(1132,1640.75) ; 1132.3,1655.2 1132.3,1657.9 1136.453,1662.053 UT2.13@1136.453,1663.754
  BottomLayer w0.2: v2(1132,1640.75) 1132,1639.5 1137.25,1634.25 J4.21@1156.5,1634.25 ; 1155.088,1634.25 ccw(c1155.088,1635.712) J4.21@1156.122,1634.678 ; 1155.329,1634.25 cw(c1155.329,1633.129) J4.21@1156.122,1633.922 ; 1155.57,1634.25 ccw(c1155.57,1635.23) J4.21@1156.263,1634.537 ; 1155.812,1634.25 cw(c1155.812,1633.612) J4.21@1156.263,1634.063
XM0DATA5: J1.175 J4.22 UT2.12 | length 61.8
  TopLayer w0.135: 1131.497,1646.803 1131.497,1650.897 1131.896,1651.296 J1.175@1131.896,1653.706
  TopLayer w0.2: v2(1131.25,1640) 1131.25,1641.75 1131.496,1641.996 1131.496,1642.596 ; 1131.5,1642.6 1131.5,1646.8 ; J1.175@1131.896,1653.706 1131.9,1653.71 1131.9,1663.6 1133.804,1665.504 UT2.12@1134.703,1665.504
  BottomLayer w0.2: v2(1131.25,1640) 1131.25,1639 1136.5,1633.75 1146,1633.75 1146.45,1633.3 1157.5,1633.3 J4.22@1158.5,1634.3 ; J4.22@1157.965,1634.3 cw(c1156.673,1634.3) 1157.587,1633.387 cw(c1158.5,1632.473) J4.22@1158.5,1633.765 ; J4.22@1158.165,1634.3 cw(c1157.356,1634.3) 1157.928,1633.728 cw(c1158.5,1633.156) J4.22@1158.5,1633.965
XM0DATA6: J1.174 J4.23 UT2.11 | length 64.2
  TopLayer w0.135: J1.174@1131.096,1648.506 1131.096,1650.9 1131.497,1651.302 1131.497,1655.197
  TopLayer w0.2: v2(1130.5,1640.75) 1130.5,1641.75 1131.096,1642.346 J1.174@1131.096,1648.506 ; 1131.5,1655.2 1131.5,1663.8 1133.704,1666.004 UT2.11@1134.703,1666.004
  BottomLayer w0.2: v2(1130.5,1640.75) 1130.5,1639.1 1143.441,1626.159 1152.068,1626.159 1152.494,1626.585 1152.494,1628.591 1156.233,1632.331 J4.23@1156.335,1632.331
XM0DATA7: J1.173 J4.24 UT2.10 | length 71.6
  TopLayer w0.135: 1130.695,1646.805 1130.695,1650.895 1131.096,1651.296 J1.173@1131.096,1653.706
  TopLayer w0.2: v2(1129.75,1640) 1129.75,1641.754 1130.696,1642.7 1130.7,1642.7 1130.7,1646.8 ; J1.173@1131.096,1653.706 1131.096,1663.996 1133.604,1666.504 UT2.10@1134.703,1666.504
  BottomLayer w0.2: v2(1129.75,1640) 1129.75,1639.15 1143.2,1625.7 1152.194,1625.7 1152.894,1626.4 1152.894,1628.392 1155.802,1631.3 1157.5,1631.3 J4.24@1158.5,1632.3 ; J4.24@1157.965,1632.3 cw(c1156.673,1632.3) 1157.587,1631.387 cw(c1158.5,1630.473) J4.24@1158.5,1631.765 ; J4.24@1158.165,1632.3 cw(c1157.356,1632.3) 1157.928,1631.728 cw(c1158.5,1631.156) J4.24@1158.5,1631.965
XM0DATA8: J1.188 J4.9 UT2.31 | length 54.5
  TopLayer w0.135: J1.188@1136.696,1648.506 1136.696,1650.896 1137.094,1651.294 1137.094,1655.194
  TopLayer w0.2: J1.188@1136.66,1647.307 1136.66,1647.09 1137.271,1646.479 v2(1137.59,1646.479) ; J1.188@1136.696,1647.307 J1.188@1136.696,1648.506 ; 1137.1,1655.2 1137.1,1655.74 1139.66,1658.3 1142.3,1658.3 1146.6,1662.6 1146.6,1666.5 1144.596,1668.504 UT2.31@1143.703,1668.504
  BottomLayer w0.2: v2(1137.59,1646.479) 1139.479,1646.479 1141.5,1648.5 1145.75,1648.5 1148.127,1646.123 J4.9@1156.487,1646.123 ; 1154.782,1646.123 ccw(c1154.782,1648.018) J4.9@1156.122,1646.678 ; 1155.264,1646.123 ccw(c1155.264,1647.536) J4.9@1156.263,1646.537 ; 1155.635,1646.123 cw(c1155.635,1645.435) J4.9@1156.122,1645.922 ; 1155.747,1646.123 ccw(c1155.747,1647.053) J4.9@1156.405,1646.395
XM0DATA9: J1.187 J4.10 UT2.29 | length 56.7
  TopLayer w0.135: 1136.296,1646.804 1136.296,1650.905 1136.696,1651.304 J1.187@1136.696,1653.706
  TopLayer w0.2: 1136.3,1646.8 1136.3,1646.27 v2(1136.802,1645.768) ; J1.187@1136.7,1653.71 1136.7,1655.906 1139.494,1658.7 1142.1,1658.7 1146.2,1662.8 1146.2,1666.2 1144.896,1667.504 UT2.29@1143.703,1667.504
  BottomLayer w0.2: v2(1136.802,1645.768) 1139.518,1645.768 1141.75,1648 1145.5,1648 1148.2,1645.3 1157.4,1645.3 J4.10@1158.4,1646.3 ; 1157.416,1645.316 cw(c1158.5,1644.232) J4.10@1158.5,1645.765 ; 1157.657,1645.557 ccw(c1156.915,1646.3) J4.10@1157.965,1646.3 ; 1157.757,1645.657 cw(c1158.5,1644.915) J4.10@1158.5,1645.965 ; 1157.999,1645.899 ccw(c1157.598,1646.3) J4.10@1158.165,1646.3
XM0DATA10: J1.186 J4.11 UT2.28 | length 55
  TopLayer w0.135: J1.186@1135.896,1648.506 1135.896,1650.896 1136.296,1651.296 1136.296,1655.196
  TopLayer w0.2: J1.186@1135.896,1648.506 1135.896,1645.604 1136.5,1645 v2(1137.6,1645) ; 1136.3,1655.2 1136.3,1656.072 1139.328,1659.1 1141.934,1659.1 1145.8,1662.966 1145.8,1666 1144.8,1667 UT2.28@1143.8,1667
  BottomLayer w0.2: v2(1137.6,1645) 1139.5,1645 1142,1647.5 1145.25,1647.5 1148.5,1644.25 J4.11@1156.25,1644.25 ; 1155.088,1644.25 ccw(c1155.088,1645.712) J4.11@1156.122,1644.678 ; 1155.329,1644.25 cw(c1155.329,1643.129) J4.11@1156.122,1643.922 ; 1155.57,1644.25 ccw(c1155.57,1645.23) J4.11@1156.263,1644.537 ; 1155.812,1644.25 cw(c1155.812,1643.612) J4.11@1156.263,1644.063 ; J4.11@1156.25,1644.3 J4.11@1156.5,1644.3
XM0DATA11: J1.185 J4.12 UT2.27 | length 58.2
  TopLayer w0.135: 1135.497,1646.797 1135.497,1650.897 1135.896,1651.296 J1.185@1135.896,1653.706
  TopLayer w0.2: 1135.496,1646.796 1135.496,1644.754 1136,1644.25 v2@1136.75,1644.25 ; J1.185@1135.9,1653.71 1135.9,1656.237 1139.163,1659.5 1141.769,1659.5 1145.4,1663.131 1145.4,1665.8 1144.696,1666.504 UT2.27@1143.703,1666.504
  BottomLayer w0.2: v2(1136.802,1644.294) 1139.544,1644.294 1142.25,1647 1145,1647 1148.7,1643.3 1157.5,1643.3 J4.12@1158.5,1644.3 ; J4.12@1157.965,1644.3 cw(c1156.673,1644.3) 1157.587,1643.387 cw(c1158.5,1642.473) J4.12@1158.5,1643.765 ; J4.12@1158.165,1644.3 cw(c1157.356,1644.3) 1157.928,1643.728 cw(c1158.5,1643.156) J4.12@1158.5,1643.965
XM0DATA12: J1.184 J4.13 UT2.26 | length 56.4
  TopLayer w0.135: J1.184@1135.096,1648.506 1135.096,1650.896 1135.497,1651.297 1135.497,1655.197
  TopLayer w0.2: J1.184@1135.096,1648.506 1135.096,1644.154 1135.743,1643.507 v2@1137.5,1643.507 ; 1135.5,1655.2 1135.5,1656.403 1138.997,1659.9 1141.603,1659.9 1145,1663.297 1145,1665.6 1144.596,1666.004 UT2.26@1143.703,1666.004
  BottomLayer w0.2: v2(1137.59,1643.507) 1139.507,1643.507 1142.5,1646.5 1144.75,1646.5 1149,1642.25 J4.13@1156.5,1642.25 ; 1155.088,1642.25 ccw(c1155.088,1643.712) J4.13@1156.122,1642.678 ; 1155.329,1642.25 cw(c1155.329,1641.129) J4.13@1156.122,1641.922 ; 1155.571,1642.25 ccw(c1155.571,1643.229) J4.13@1156.263,1642.537 ; 1155.812,1642.25 cw(c1155.812,1641.612) J4.13@1156.263,1642.063
XM0DATA13: J1.183 J4.14 UT2.25 | length 56.6
  TopLayer w0.135: 1134.695,1646.805 1134.695,1650.895 1135.096,1651.296 J1.183@1135.096,1653.706
  TopLayer w0.2: 1134.7,1646.8 1134.696,1646.804 1134.696,1643.87 1135.77,1642.796 v2(1136.802,1642.796) ; J1.183@1135.1,1653.71 1135.1,1656.569 1138.831,1660.3 ; 1138.9,1660.3 1141.437,1660.3 1144.6,1663.463 1144.6,1665.3 1144.396,1665.504 UT2.25@1143.703,1665.504 ; UT2.25@1144.303,1665.454 cw(c1144.303,1665.11) 1144.547,1665.353
  BottomLayer w0.2: v2(1136.802,1642.796) 1141.954,1642.796 1143.45,1641.3 1157.55,1641.3 J4.14@1158.424,1642.174 ; 1157.575,1641.325 ccw(c1156.633,1642.267) J4.14@1157.965,1642.291 ; 1157.672,1641.422 cw(c1158.5,1640.594) J4.14@1158.5,1641.765 ; 1157.908,1641.658 ccw(c1157.288,1642.279) J4.14@1158.165,1642.294 ; 1158.013,1641.763 cw(c1158.5,1641.277) J4.14@1158.5,1641.965
XM0DATA14: J1.182 J4.15 UT2.24 | length 51.5
  TopLayer w0.135: J1.182@1134.296,1648.506 1134.296,1650.896 1134.695,1651.295 1134.695,1655.195
  TopLayer w0.2: J1.182@1134.296,1648.506 1134.296,1643.704 1135.941,1642.059 v2(1137.615,1642.059) ; 1134.7,1655.2 1134.7,1656.734 1138.666,1660.7 1140.8,1660.7 1141.953,1661.853 UT2.24@1141.953,1663.754
  BottomLayer w0.2: v2@1137.514,1642.034 1142.035,1642.034 1143.769,1640.3 J4.15@1156.5,1640.3 ; J4.15@1156.122,1639.922 ccw(c1155.208,1639.008) 1155.208,1640.3 ccw(c1155.208,1641.592) J4.15@1156.122,1640.678 ; J4.15@1156.263,1640.063 ccw(c1155.691,1639.491) 1155.691,1640.3 ccw(c1155.691,1641.109) J4.15@1156.263,1640.537
XM0DATA15: J1.181 J4.16 UT2.22 | length 54.5
  TopLayer w0.135: 1133.896,1646.804 1133.896,1650.896 1134.296,1651.296 J1.181@1134.296,1653.706
  TopLayer w0.2: 1133.9,1646.8 1133.896,1646.796 1133.896,1643.354 1135.953,1641.297 v2(1136.802,1641.297) ; J1.181@1134.296,1653.706 1134.296,1656.454 ; 1134.3,1656.304 1134.3,1656.9 1138.5,1661.1 1140.2,1661.1 1140.953,1661.853 UT2.22@1140.953,1663.754
  BottomLayer w0.2: v2(1136.802,1641.297) 1138.953,1641.297 1140.95,1639.3 1157.5,1639.3 1158.4,1640.2 J4.16@1158.5,1640.3 ; 1157.928,1639.728 ccw(c1157.356,1640.3) J4.16@1158.165,1640.3 ; 1157.928,1639.728 cw(c1158.5,1639.156) J4.16@1158.5,1639.965 ; J4.16@1157.965,1640.3 cw(c1156.673,1640.3) 1157.587,1639.387 cw(c1158.5,1638.473) J4.16@1158.5,1639.765
XM0DATA_RDN: J1.192
XM0OEN: J1.194 J4.7 UT2.35 | length 57.5
  TopLayer w0.135: 1137.896,1655.196 1137.896,1651.504 1139.096,1650.304 J1.194@1139.096,1648.506
  TopLayer w0.2: 1137.9,1655.2 1137.9,1655.975 1139.825,1657.9 1142.5,1657.9 1147.6,1663 1147.6,1670.2 1147.296,1670.504 UT2.35@1143.703,1670.504 ; J1.194@1139.096,1648.506 1139.096,1646.243 1139.825,1645.514 1142.187,1645.514 1145.235,1648.562 1156.188,1648.562 J4.7@1156.5,1648.25 ; 1154.577,1648.562 cw(c1154.577,1646.377) J4.7@1156.122,1647.922 ; 1155.06,1648.562 cw(c1155.06,1646.86) J4.7@1156.263,1648.063 ; 1155.543,1648.562 cw(c1155.543,1647.343) J4.7@1156.405,1648.205 ; 1155.84,1648.562 ccw(c1155.84,1648.96) J4.7@1156.122,1648.678
XM0WAITN: J1.191 J4.8 | length 32.1
  TopLayer w0.135: J1.191@1138.296,1653.706 1138.296,1651.604 1139.497,1650.403 1139.497,1646.906
  TopLayer w0.2: 1139.5,1646.9 1139.496,1646.904 1139.496,1646.427 1140.003,1645.92 1141.984,1645.92 1145.314,1649.25 1157.55,1649.25 J4.8@1158.5,1648.3 ; J4.8@1157.965,1648.3 ccw(c1156.673,1648.3) 1157.587,1649.213 ccw(c1158.5,1650.127) J4.8@1158.5,1648.835 ; J4.8@1158.165,1648.3 ccw(c1157.356,1648.3) 1157.928,1648.872 ccw(c1158.5,1649.444) J4.8@1158.5,1648.635
XM0WEN: J1.193 J4.6 UT2.36 | length 59.2
  TopLayer w0.12: J1.193@1139.096,1653.706 J1.193@1139.096,1653.706
  TopLayer w0.135: J1.193@1139.096,1653.706 1139.096,1651.744 1140.296,1650.544 1140.296,1646.954
  TopLayer w0.2: J1.193@1139.096,1653.706 1139.096,1655.859 1139.1,1655.863 1139.1,1656.043 1140.157,1657.1 1142.9,1657.1 1148.4,1662.6 1148.4,1670.6 1147,1672 1145.6,1672 1144.604,1671.004 UT2.36@1143.703,1671.004 ; 1140.3,1647 1140.3,1646.95 1140.5,1646.75 1141.62,1646.75 1146.12,1651.25 1157.55,1651.25 J4.6@1158.5,1650.3 ; J4.6@1157.965,1650.3 ccw(c1156.673,1650.3) 1157.587,1651.213 ccw(c1158.5,1652.127) J4.6@1158.5,1650.835 ; J4.6@1158.165,1650.3 ccw(c1157.356,1650.3) 1157.928,1650.872 ccw(c1158.5,1651.444) J4.6@1158.5,1650.635
XMMC0CDN: J1.253 RS16.2 | length 49.4
  TopLayer w0.2: J1.253@1143.715,1617.595 1147.951,1617.595 1154.845,1610.7 1181.8,1610.7 1186,1606.5 RS16.2@1186.25,1606.5 ; 1185.176,1607.324 ccw(c1186.2,1608.349) RS16.2@1186.2,1606.9 ; 1185.517,1606.983 ccw(c1186.2,1607.666) RS16.2@1186.2,1606.7 ; 1185.659,1606.841 cw(c1185.317,1606.5) RS16.2@1185.8,1606.5
XMMC0CLK: J1.254 RS11.1 | length 59
  TopLayer w0.135: J1.254@1138.515,1617.595 1140.785,1617.595 1141.185,1617.194 1145.605,1617.194 ; J1.254@1139.658,1617.501 cw(c1139.884,1617.275) 1139.884,1617.595 cw(c1139.884,1617.914) J1.254@1139.658,1617.688
  TopLayer w0.2: 1145.605,1617.195 1147.773,1617.195 1154.668,1610.3 1181.634,1610.3 1184.605,1607.329 1184.605,1603.502 1186.107,1602 RS11.1@1186.25,1602 ; 1185.359,1602.748 ccw(c1186.2,1603.59) RS11.1@1186.2,1602.4 ; 1185.583,1602.524 cw(c1185.058,1602) RS11.1@1185.8,1602 ; RS11.1@1185.7,1602.407 ccw(c1186.2,1602.907) RS11.1@1186.2,1602.2
XMMC0CMD: J1.252 RS12.1 | length 53.5
  TopLayer w0.135: J1.252@1138.515,1618.395 1140.87,1618.395 1141.271,1617.994 1145.605,1617.994 ; J1.252@1139.658,1618.301 cw(c1139.884,1618.075) 1139.884,1618.395 cw(c1139.884,1618.714) J1.252@1139.658,1618.488
  TopLayer w0.2: 1145.605,1617.995 1148.116,1617.995 1155.011,1611.1 1186.15,1611.1 RS12.1@1186.25,1611 ; 1184.993,1611.1 cw(c1184.993,1609.793) RS12.1@1185.917,1610.717 ; RS12.1@1185.917,1611.283 cw(c1185.476,1611.724) 1185.476,1611.1 cw(c1185.476,1610.276) RS12.1@1186.059,1610.859
XMMC0DATA0: J1.255 RS10.1 | length 57.3
  TopLayer w0.2: J1.255@1143.715,1616.795 1147.608,1616.795 1154.502,1609.9 1181.469,1609.9 1184.069,1607.3 1184.069,1599.459 1186.028,1597.5 RS10.1@1186.25,1597.5 ; 1185.223,1598.305 ccw(c1186.2,1599.282) RS10.1@1186.2,1597.9 ; 1185.564,1597.963 ccw(c1186.2,1598.599) RS10.1@1186.2,1597.7 ; 1185.639,1597.889 cw(c1185.251,1597.5) RS10.1@1185.8,1597.5
XMMC0DATA1: J1.256 RS9.1 | length 64
  TopLayer w0.135: J1.256@1138.515,1616.795 1140.978,1616.795 1141.377,1616.395 1145.595,1616.395 ; J1.256@1139.658,1616.701 cw(c1139.884,1616.475) 1139.884,1616.795 cw(c1139.884,1617.114) J1.256@1139.658,1616.888
  TopLayer w0.2: 1145.6,1616.4 1145.605,1616.395 1147.442,1616.395 1154.336,1609.5 1181.303,1609.5 1183.669,1607.134 1183.669,1598.435 1186.104,1596 RS9.1@1186.25,1596 ; 1185.353,1596.751 ccw(c1186.2,1597.598) RS9.1@1186.2,1596.4 ; 1185.585,1596.519 cw(c1185.067,1596) RS9.1@1185.8,1596 ; 1185.694,1596.409 ccw(c1186.2,1596.915) RS9.1@1186.2,1596.2
XMMC0DATA2: J1.250 RS14.1 | length 58.2
  TopLayer w0.135: J1.250@1138.515,1619.195 1140.817,1619.195 1141.216,1618.795 1145.605,1618.795 ; J1.250@1139.658,1619.101 cw(c1139.884,1618.875) 1139.884,1619.195 cw(c1139.884,1619.514) J1.250@1139.658,1619.288
  TopLayer w0.2: 1145.605,1618.795 1148.455,1618.795 1155.35,1611.9 1183.9,1611.9 1184.8,1612.8 1184.8,1615.9 1185.9,1617 RS14.1@1186.25,1617 ; 1185.005,1616.105 cw(c1186.2,1614.91) RS14.1@1186.2,1616.6 ; 1185.346,1616.446 cw(c1186.2,1615.593) RS14.1@1186.2,1616.8 ; 1185.688,1616.788 cw(c1186.2,1616.276) RS14.1@1186.2,1617 ; RS14.1@1185.729,1616.829 ccw(c1185.559,1617) RS14.1@1185.8,1617
XMMC0DATA3: J1.251 RS13.1 | length 48.8
  TopLayer w0.2: J1.251@1143.715,1618.395 1148.29,1618.395 1155.184,1611.5 1184.9,1611.5 1185.9,1612.5 RS13.1@1186.25,1612.5 ; 1185.005,1611.605 cw(c1186.2,1610.41) RS13.1@1186.2,1612.1 ; 1185.346,1611.946 cw(c1186.2,1611.093) RS13.1@1186.2,1612.3 ; 1185.688,1612.288 cw(c1186.2,1611.776) RS13.1@1186.2,1612.5 ; RS13.1@1185.729,1612.329 ccw(c1185.559,1612.5) RS13.1@1185.8,1612.5
XMMC1CDN: J1.261 RD7.2 TF.1 | length 97.1
  TopLayer w0.2: J1.261@1143.715,1614.395 1146.484,1614.395 1169.678,1591.2 1176.4,1591.2 1184.7,1582.9 1203.35,1582.9 v2(1204.5,1581.75) ; TF.1@1210,1578.465 cw(c1210,1577.173) 1210.913,1578.087 cw(c1211.827,1579) TF.1@1210.535,1579 ; TF.1@1210,1578.665 cw(c1210,1577.856) 1210.572,1578.428 cw(c1211.144,1579) TF.1@1210.335,1579 ; TF.1@1210,1579 1211.25,1577.75 1211.25,1575.25 RD7.2@1213.5,1573 ; 1212.746,1573.754 cw(c1211.893,1572.9) RD7.2@1213.1,1572.9 ; 1212.988,1573.512 ccw(c1213.5,1574.024) RD7.2@1213.5,1573.3 ; 1213.088,1573.412 cw(c1212.576,1572.9) RD7.2@1213.3,1572.9
  BottomLayer w0.2: v2(1204.5,1581.75) 1207.25,1581.75 TF.1@1210,1579 ; TF.1@1209.465,1579 ccw(c1208.173,1579) 1209.087,1579.913 ccw(c1210,1580.827) TF.1@1210,1579.535 ; TF.1@1209.665,1579 ccw(c1208.856,1579) 1209.428,1579.572 ccw(c1210,1580.144) TF.1@1210,1579.335
XMMC1CLK: CS2.1 J1.262 RD3.2 TF.7 | length 104.1
  TopLayer w0.135: J1.262@1138.515,1614.395 1141.488,1614.395 1141.886,1613.996 1145.196,1613.996 ; J1.262@1139.658,1614.301 cw(c1139.884,1614.075) 1139.884,1614.395 cw(c1139.884,1614.714) J1.262@1139.658,1614.488
  TopLayer w0.2: 1145.2,1614 1146.294,1614 1146.294,1613.995 1169.489,1590.8 1176.2,1590.8 1184.5,1582.5 1202.5,1582.5 1204.011,1580.989 TF.7@1204.011,1578.989 1205,1578 1205,1576 1203.6,1574.6 RD3.2@1203.6,1572.85 ; RD3.2@1203.117,1573.183 ccw(c1201.951,1574.349) 1203.6,1574.349 ; RD3.2@1203.259,1573.041 ccw(c1202.434,1573.866) 1203.6,1573.866 ; RD3.2@1203.4,1572.9 ccw(c1202.917,1573.383) 1203.6,1573.383 ccw(c1203.883,1573.383) RD3.2@1203.683,1573.183 ; RD3.2@1203.541,1572.659 cw(c1203.928,1572.272) 1203.928,1572.819 ; RD3.2@1203.631,1572.819 CS2.1@1205.302,1572.819 ; TF.7@1203.633,1579.367 ccw(c1202.719,1580.28) 1204.011,1580.28 ccw(c1205.303,1580.28) TF.7@1204.389,1579.367 ; RD3.2@1203.683,1572.517 cw(c1204.411,1571.79) 1204.411,1572.819 ; RD3.2@1203.683,1573.083 ccw(c1204.321,1573.721) 1204.321,1572.819 ; TF.7@1203.774,1579.226 ccw(c1203.202,1579.798) 1204.011,1579.798 ccw(c1204.82,1579.798) TF.7@1204.248,1579.226 ; TF.7@1204.011,1578.454 cw(c1204.011,1577.162) 1204.924,1578.075 cw(c1205.838,1578.989) TF.7@1204.546,1578.989 ; TF.7@1204.011,1578.654 cw(c1204.011,1577.845) 1204.583,1578.417 cw(c1205.155,1578.989) TF.7@1204.346,1578.989 ; 1204.091,1572.819 ccw(c1204.091,1573.848) CS2.1@1204.819,1573.12 ; 1204.181,1572.819 cw(c1204.181,1571.916) CS2.1@1204.819,1572.554 ; 1204.574,1572.819 ccw(c1204.574,1573.365) CS2.1@1204.96,1572.979
XMMC1CMD: J1.260 RD4.2 TF.5 | length 99.7
  TopLayer w0.135: J1.260@1138.515,1615.195 1141.197,1615.195 1141.597,1614.795 1145.205,1614.795 ; J1.260@1139.658,1615.101 cw(c1139.884,1614.875) 1139.884,1615.195 cw(c1139.884,1615.514) J1.260@1139.658,1615.288
  TopLayer w0.2: 1145.205,1614.795 1146.668,1614.795 ; 1146.668,1614.776 1146.668,1614.795 ; TF.5@1205.633,1579.367 ccw(c1204.719,1580.28) 1206.011,1580.28 ccw(c1207.303,1580.28) TF.5@1206.389,1579.367 ; TF.5@1205.774,1579.226 ccw(c1205.202,1579.798) 1206.011,1579.798 ccw(c1206.82,1579.798) TF.5@1206.248,1579.226 ; TF.5@1206.011,1578.454 cw(c1206.011,1577.765) 1206.498,1578.252 ; TF.5@1206.144,1578.968 ccw(c1206.759,1578.871) 1206.319,1578.431 ; TF.5@1206.342,1578.937 ccw(c1207.24,1578.796) 1206.597,1578.153 ; TF.5@1206.54,1578.906 ccw(c1207.72,1578.72) 1206.875,1577.875 ; RD4.2@1208.417,1573.183 ccw(c1207.734,1573.866) 1208.7,1573.866 ccw(c1209.666,1573.866) RD4.2@1208.983,1573.183 ; RD4.2@1208.7,1572.85 1208.7,1574.05 1207,1575.75 1207,1577.75 1206.011,1578.739 1206.011,1581.489 1204.2,1583.3 1184.9,1583.3 1176.6,1591.6 1169.863,1591.6 1146.668,1614.795